# Altium PCB STAND_SSD_2246(CPU).PcbDoc (part 3 of 7)
Units mm, origin at the board's own origin, x right, y up, seen from the top; angles counter-clockwise.
Board outline 70 x 170 mm, 8 copper layers (L1:Top, L2:GND, L3:Sig, L4:VCC, L5:Sig, L6:Sig, L7:GND, L8:Bot), stack 1.112 mm thick; 174 components, 271 nets, 1671 pads, 771 vias.
Unrouted connection lines stored in the file: 138.
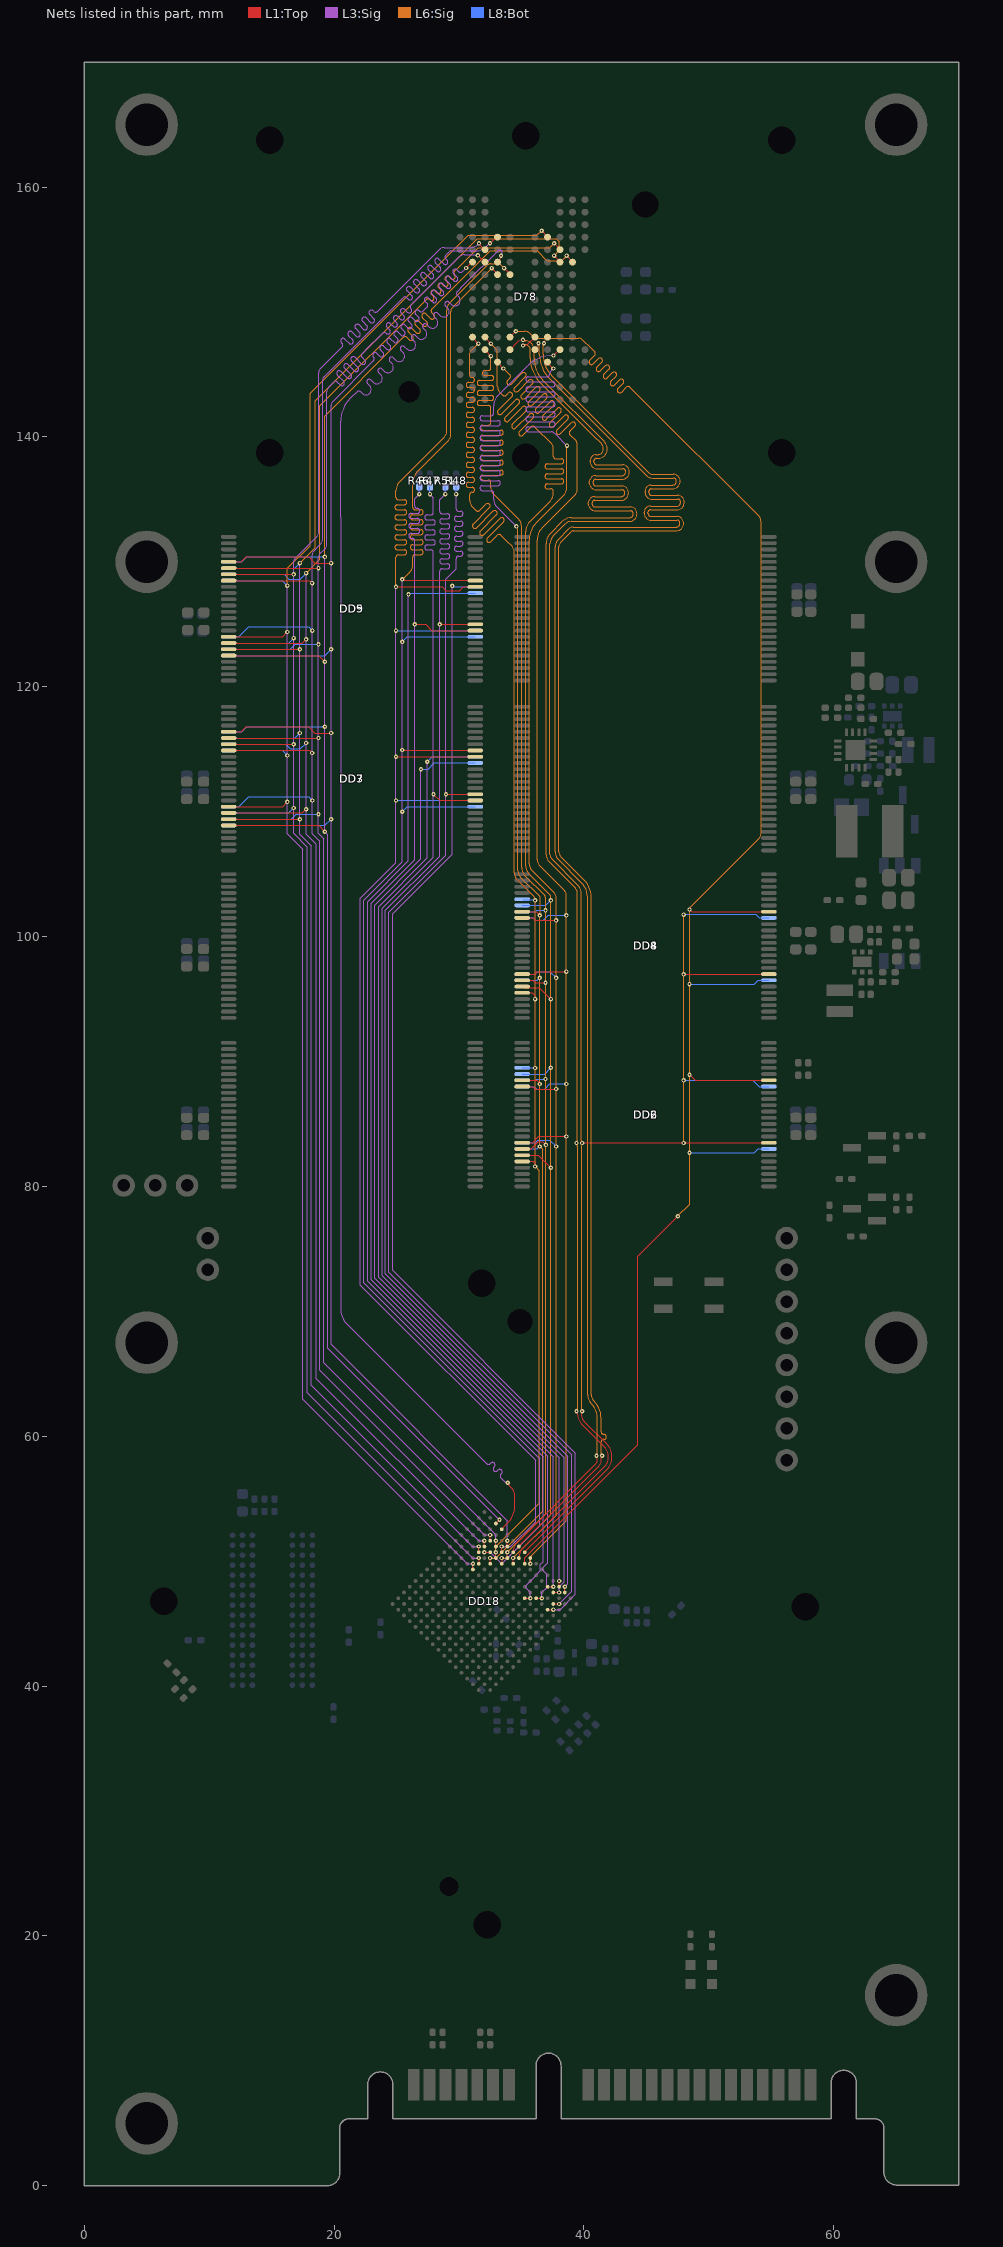
[diagram p9: the nets of this part, all layers, seen from the top]

## Via types
v1: diameter 0.35, hole 0.15, L1:Top to L8:Bot, tented both sides, 722 vias
v2: diameter 0.6, hole 0.3, L1:Top to L8:Bot, tented both sides, 45 vias
v3: diameter 0.6, hole 0.3, L1:Top to L8:Bot, tented bottom, 4 vias

## Nets (pads, with @x,y where several pads share a name; then routed paths per layer and width w, separated by ;. In a path a pad name is that pad's centre, name@x,y a point inside that pad or via, vN(x,y) a via of type N, cw(c..) or ccw(c..) an arc to the next point about the centre after c; other vN are vias at no path point) (continued)
F0D2: D78.N9 DD2.31 DD4.31 DD6.31 DD8.31 DD18.N12 | length 132
  L1:Top w0.1: DD18.N12@32.499,49.797 v1(32.499,50.256) ; DD2.31@35.059,88.5 36.212,88.5 v1@36.506,88.207 ; DD4.31@35.059,102 36.169,102 v1(36.469,101.7) ; v1(37.57,146.526) D78.N9@38.037,146.993
  L3:Sig w0.1: v1@34.616,132.867 v1(34.592,132.843) 33.024,134.412 cw(c33.622,135.009) 32.777,135.009 32.777,135.455 32.777,135.505 ccw(c32.577,135.505) 32.577,135.705 31.881,135.705 cw(c31.881,135.905) 31.881,136.105 33.119,136.105 ccw(c33.119,136.305) 33.119,136.505 31.881,136.505 cw(c31.881,136.705) 31.881,136.905 33.119,136.905 ccw(c33.119,137.105) 33.119,137.305 31.881,137.305 cw(c31.881,137.505) 31.881,137.705 33.119,137.705 ccw(c33.119,137.905) 33.119,138.105 31.881,138.105 cw(c31.881,138.305) 31.881,138.505 33.119,138.505 ccw(c33.119,138.705) 33.119,138.905 31.881,138.905 cw(c31.881,139.105) 31.881,139.305 33.119,139.305 ccw(c33.119,139.505) 33.119,139.705 31.881,139.705 cw(c31.881,139.905) 31.881,140.105 33.119,140.105 ccw(c33.119,140.305) 33.119,140.505 31.881,140.505 cw(c31.881,140.705) 31.881,140.905 33.119,140.905 ccw(c33.119,141.105) 33.119,141.305 31.881,141.305 cw(c31.881,141.505) 31.881,141.705 32.577,141.705 ccw(c32.577,141.905) 32.777,141.905 32.777,142.306 32.777,142.496 cw(c33.907,142.496) 33.107,143.294 35.518,145.705 cw(c37.499,143.724) 37.499,146.526 v1(37.57,146.526)
  L6:Sig w0.1: v1(32.499,50.256) 32.959,50.256 36.69,53.987 36.69,82.979 v1(36.469,83.2) v1(36.469,96.7) v1(36.469,101.7) ; v1(34.592,132.843) cw(c34.279,132.53) 34.722,132.53 34.722,105.291 ccw(c35.511,105.291) 34.953,104.733 36.427,103.259 cw(c36.242,103.073) 36.504,103.073 v1@36.504,101.746
  L8:Bot w0.1: DD6.31@35.064,83 36.281,83 v1@36.491,83.21 ; DD8.31@35.064,96.5 36.259,96.5 v1@36.485,96.726
  other v1: 36.469,88.2
F0D3: D78.P8 DD2.32 DD4.32 DD6.32 DD8.32 DD18.R10 | length 137.5
  L1:Top w0.1: DD18.R10@34.338,49.797 v1(34.338,50.256) ; DD2.32@35.059,88 35.907,88 36.107,87.8 v1(37.779,87.8) ; DD4.32@35.059,101.5 35.912,101.5 36.112,101.3 v1(37.779,101.3) ; D78.P8@37.088,145.942 v1(37.556,145.475)
  L3:Sig w0.1: v1(37.556,145.475) 37.556,145.466 37.43,145.34 37.289,145.2 37.25,145.104 37.25,145.013 cw(c37.05,145.013) 37.05,144.813 35.561,144.813 ccw(c35.561,144.613) 35.561,144.413 37.504,144.413 cw(c37.504,144.213) 37.504,144.013 35.561,144.013 ccw(c35.561,143.813) 35.561,143.613 37.504,143.613 cw(c37.504,143.413) 37.504,143.213 35.561,143.213 ccw(c35.561,143.013) 35.561,142.813 37.504,142.813 cw(c37.504,142.613) 37.504,142.413 35.561,142.413 ccw(c35.561,142.213) 35.561,142.013 37.504,142.013 cw(c37.504,141.813) 37.504,141.613 35.561,141.613 ccw(c35.561,141.413) 35.561,141.213 37.504,141.213 cw(c37.504,141.013) 37.504,140.813 35.561,140.813 ccw(c35.561,140.613) 35.561,140.413 37.404,140.413 cw(c37.404,140.071) 37.645,140.313 37.695,140.263 v1(38.648,139.31)
  L6:Sig w0.1: v1@34.395,50.199 34.395,50.314 37.779,53.698 37.779,54.878 v1(37.779,83.2) v1(37.779,96.7) v1(37.779,101.3) 37.779,103.134 ccw(c37.256,103.134) 37.626,103.504 35.862,105.268 cw(c36.439,105.845) 35.623,105.845 35.623,131.745 cw(c37.601,131.745) 36.202,133.144 38.381,135.323 ccw(c37.737,135.967) 38.648,135.967 v1(38.648,139.31)
  L8:Bot w0.1: DD6.32@35.064,83.5 36.092,83.5 36.292,83.7 37.279,83.7 v1(37.779,83.2) ; DD8.32@35.064,97 36.072,97 36.272,97.2 37.279,97.2 v1(37.779,96.7)
F0D4: D78.P4 DD2.41 DD4.41 DD6.41 DD8.41 DD18.U9 | length 140.7
  L1:Top w0.1: D78.P4@33.088,145.942 v1(33.556,145.475) ; DD2.41@35.059,83.5 35.074,83.514 35.907,83.514 36.394,84.001 v1(38.599,84) ; DD4.41@35.059,97 36.059,97 36.259,97.2 v1(38.599,97.2) ; v1(35.717,49.797) DD18.U9@35.717,50.256
  L6:Sig w0.1: v1(33.556,145.475) 33.585,145.475 33.756,145.303 34.075,144.985 cw(c33.933,144.844) 34.075,144.702 33.884,144.511 ccw(c34.025,144.37) 33.884,144.229 ccw(c34.025,144.37) 34.167,144.229 35.036,145.098 cw(c35.177,144.957) 35.319,145.098 cw(c35.177,144.957) 35.319,144.815 34.449,143.946 ccw(c34.591,143.804) 34.449,143.663 ccw(c34.591,143.804) 34.732,143.663 35.602,144.532 cw(c35.743,144.391) 35.885,144.532 cw(c35.743,144.391) 35.885,144.25 35.015,143.38 ccw(c35.157,143.239) 35.015,143.097 ccw(c35.157,143.239) 35.298,143.097 36.167,143.967 cw(c36.309,143.825) 36.45,143.967 cw(c36.309,143.825) 36.45,143.684 35.581,142.814 ccw(c35.722,142.673) 35.581,142.532 ccw(c35.722,142.673) 35.864,142.532 36.733,143.401 cw(c36.875,143.26) 37.016,143.401 cw(c36.875,143.26) 37.016,143.118 36.147,142.249 ccw(c36.288,142.107) 36.147,141.966 ccw(c36.288,142.107) 36.429,141.966 37.299,142.835 cw(c37.44,142.694) 37.582,142.835 cw(c37.44,142.694) 37.582,142.552 36.712,141.683 ccw(c36.854,141.542) 36.712,141.4 ccw(c36.854,141.542) 36.995,141.4 37.864,142.27 cw(c38.006,142.128) 38.147,142.27 cw(c38.006,142.128) 38.147,141.987 37.278,141.117 ccw(c37.419,140.976) 37.278,140.834 ccw(c37.419,140.976) 37.561,140.834 38.43,141.704 cw(c38.572,141.563) 38.713,141.704 cw(c38.572,141.563) 38.713,141.421 37.844,140.552 ccw(c37.985,140.41) 37.844,140.269 ccw(c37.985,140.41) 38.126,140.269 38.996,141.138 cw(c39.137,140.997) 39.279,141.138 cw(c39.137,140.997) 39.279,140.855 38.883,140.46 ccw(c39.024,140.318) 38.883,140.177 39.332,139.727 cw(c39.024,139.419) 39.46,139.419 39.46,135.824 cw(c38.71,135.824) 39.24,135.293 36.674,132.726 ccw(c37.68,131.72) 36.257,131.72 36.257,106.137 ccw(c36.925,106.137) 36.453,105.664 38.424,103.693 cw(c38.003,103.271) 38.599,103.271 v1(38.599,101.7) v1(38.599,97.2) v1(38.599,84) 38.599,54.582 38.599,53.222 35.717,50.339 v1(35.717,49.797)
  L8:Bot w0.1: DD6.41@35.064,88 36.032,88 36.232,87.8 36.865,87.8 37.272,88.208 38.592,88.208 v1(38.599,88.2) ; DD8.41@35.064,101.5 35.964,101.5 36.164,101.3 36.762,101.3 37.167,101.705 38.594,101.705 v1(38.599,101.7)
F0D5: D78.N3 DD2.42 DD4.42 DD6.42 DD8.42 DD18.R11 | length 133.9
  L1:Top w0.1: D78.N3@32.088,146.942 v1(32.556,146.475) ; DD18.R11@33.878,50.256 v1(33.878,50.716) ; DD2.42@35.059,83 35.776,83 36.347,83.571 36.718,83.571 v1(36.959,83.33) ; DD4.42@35.059,96.5 35.913,96.5 36.113,96.3 36.925,96.3 v1(36.929,96.304)
  L6:Sig w0.1: v1(32.556,146.475) 32.556,145.841 32.556,145.52 cw(c32.356,145.52) 32.356,145.32 32.076,145.32 ccw(c32.076,145.12) 32.076,144.92 32.597,144.92 cw(c32.597,144.72) 32.597,144.52 31.65,144.52 ccw(c31.65,144.32) 31.65,144.12 32.597,144.12 cw(c32.597,143.92) 32.597,143.72 31.65,143.72 ccw(c31.65,143.52) 31.65,143.32 32.597,143.32 cw(c32.597,143.12) 32.597,142.92 31.65,142.92 ccw(c31.65,142.72) 31.65,142.52 32.356,142.52 cw(c32.356,142.32) 32.556,142.32 32.556,142.27 32.556,141.746 32.556,141.152 cw(c32.356,141.152) 32.356,140.952 31.924,140.952 ccw(c31.924,140.752) 31.924,140.552 33.356,140.552 cw(c33.356,140.352) 33.356,140.152 31.924,140.152 ccw(c31.924,139.952) 31.924,139.752 33.356,139.752 cw(c33.356,139.552) 33.356,139.352 31.924,139.352 ccw(c31.924,139.152) 31.924,138.952 33.356,138.952 cw(c33.356,138.752) 33.356,138.552 31.924,138.552 ccw(c31.924,138.352) 31.924,138.152 33.356,138.152 cw(c33.356,137.952) 33.356,137.752 31.924,137.752 ccw(c31.924,137.552) 31.924,137.352 33.356,137.352 cw(c33.356,137.152) 33.356,136.952 31.924,136.952 ccw(c31.924,136.752) 31.924,136.552 32.356,136.552 cw(c32.356,136.352) 32.556,136.352 32.556,136.302 32.556,135.951 ccw(c33.325,135.951) 32.781,135.407 34.795,133.393 cw(c34.274,132.871) 35.011,132.871 35.011,105.536 ccw(c35.938,105.536) 35.283,104.88 36.857,103.306 cw(c36.682,103.132) 36.929,103.132 v1(36.929,102.1) v1(36.929,96.304) 36.929,83.33 36.967,83.292 36.967,53.805 v1(33.878,50.716)
  L8:Bot w0.1: DD6.42@35.064,88.5 36.094,88.5 36.194,88.6 v1(36.929,88.6) ; DD8.42@35.064,102 36.126,102 36.226,102.1 v1(36.929,102.1)
F0D6: D78.M3 DD2.43 DD4.43 DD6.43 DD8.43 DD18.P11 | length 136
  L1:Top w0.1: D78.M3@32.088,147.942 v1(32.556,147.475) ; DD18.P11@33.419,49.797 v1(33.419,50.256) ; DD2.43@35.059,82.5 36.359,82.5 v1(37.359,81.5) ; DD4.43@35.059,96 DD4.43@35.08,95.979 ; DD4.43@35.237,95.919 36.44,95.919 v1(37.359,95)
  L6:Sig w0.1: v1(32.556,147.475) 32.874,147.156 cw(c32.367,146.65) 33.084,146.65 33.084,144.07 ccw(c33.809,144.07) 33.245,143.615 ccw(c33.809,144.07) 33.277,143.577 33.296,143.558 33.505,143.349 ccw(c33.646,143.49) 33.788,143.349 33.955,143.516 cw(c34.097,143.375) 34.238,143.516 cw(c34.097,143.375) 34.238,143.234 33.136,142.131 ccw(c33.277,141.99) 33.136,141.848 ccw(c33.277,141.99) 33.419,141.848 34.521,142.951 cw(c34.663,142.809) 34.804,142.951 cw(c34.663,142.809) 34.804,142.668 33.702,141.565 ccw(c33.843,141.424) 33.702,141.283 ccw(c33.843,141.424) 33.984,141.283 35.087,142.385 cw(c35.228,142.244) 35.37,142.385 cw(c35.228,142.244) 35.37,142.102 34.267,141 ccw(c34.409,140.858) 34.267,140.717 ccw(c34.409,140.858) 34.55,140.717 35.652,141.819 cw(c35.794,141.678) 35.935,141.819 cw(c35.794,141.678) 35.935,141.536 34.833,140.434 ccw(c34.974,140.293) 34.833,140.151 ccw(c34.974,140.293) 35.116,140.151 35.768,140.803 cw(c35.909,140.662) 36.051,140.803 36.086,140.768 37.41,139.444 ; v1(33.419,50.256) 33.878,50.256 37.359,53.737 v1(37.359,89.5) v1(37.359,95) v1(37.359,102.9) 37.359,103.155 ccw(c37.085,103.155) 37.279,103.348 35.583,105.044 cw(c36.195,105.657) 35.329,105.657 35.329,132.413 cw(c36.459,132.413) 35.66,133.211 37.24,134.792 ccw(c36.468,135.564) 37.558,135.499 ccw(c36.468,135.564) 37.56,135.549 37.56,135.564 37.56,135.649 ccw(c37.36,135.649) 37.36,135.849 37.083,135.849 cw(c37.083,136.049) 37.083,136.249 38.191,136.249 ccw(c38.191,136.449) 38.191,136.649 37.083,136.649 cw(c37.083,136.849) 37.083,137.049 38.191,137.049 ccw(c38.191,137.249) 38.191,137.449 37.083,137.449 cw(c37.083,137.649) 37.083,137.849 38.191,137.849 ccw(c38.191,138.049) 38.191,138.249 37.76,138.249 cw(c37.76,138.449) 37.56,138.449 37.56,139.082 ccw(c37.048,139.082) 37.41,139.443
  L8:Bot w0.1: DD6.43@35.064,89 36.859,89 v1(37.359,89.5) ; DD8.43@35.064,102.5 36.959,102.5 v1(37.359,102.9)
F0D7: D78.M2 DD2.44 DD4.44 DD6.44 DD8.44 DD18.P12 | length 130.5
  L1:Top w0.1: D78.M2@31.088,147.942 v1(31.556,147.475) ; DD18.P12@32.959,50.256 v1(32.959,50.716) ; DD2.44@35.059,82 35.957,82 36.098,81.859 v1(36.099,81.6) ; DD4.44@35.059,95.5 35.88,95.5 36.099,95.281 v1(36.099,95)
  L6:Sig w0.1: v1(31.556,147.475) 30.984,146.903 ccw(c31.32,146.568) 30.881,146.748 ccw(c31.32,146.568) 30.863,146.698 30.845,146.568 30.845,144.969 ccw(c31.045,144.969) 31.045,144.769 31.05,144.769 cw(c31.05,144.569) 31.05,144.369 30.769,144.369 ccw(c30.769,144.169) 30.769,143.969 31.05,143.969 cw(c31.05,143.769) 31.05,143.569 30.769,143.569 ccw(c30.769,143.369) 30.769,143.169 31.05,143.169 cw(c31.05,142.969) 31.05,142.769 30.769,142.769 ccw(c30.769,142.569) 30.769,142.369 31.056,142.369 cw(c31.056,142.169) 31.056,141.969 30.769,141.969 ccw(c30.769,141.769) 30.769,141.569 31.056,141.569 cw(c31.056,141.369) 31.056,141.169 30.769,141.169 ccw(c30.769,140.969) 30.769,140.769 31.056,140.769 cw(c31.056,140.569) 31.056,140.369 30.769,140.369 ccw(c30.769,140.169) 30.769,139.969 31.056,139.969 cw(c31.056,139.769) 31.056,139.569 30.769,139.569 ccw(c30.769,139.369) 30.769,139.169 31.056,139.169 cw(c31.056,138.969) 31.056,138.769 30.769,138.769 ccw(c30.769,138.569) 30.769,138.369 31.056,138.369 cw(c31.056,138.169) 31.056,137.969 30.769,137.969 ccw(c30.769,137.769) 30.769,137.569 31.056,137.569 cw(c31.056,137.369) 31.056,137.169 30.769,137.169 ccw(c30.769,136.969) 30.769,136.769 31.056,136.769 cw(c31.056,136.569) 31.056,136.369 30.769,136.369 ccw(c30.769,136.169) 30.769,135.969 31.056,135.969 cw(c31.056,135.769) 31.056,135.569 31.045,135.569 ccw(c31.045,135.369) 30.845,135.369 30.845,134.943 ccw(c31.578,134.943) 30.845,134.919 ccw(c31.578,134.943) 31.06,134.425 31.336,134.148 31.372,134.113 ccw(c31.513,134.254) 31.655,134.113 32.155,134.613 cw(c32.296,134.472) 32.438,134.613 cw(c32.296,134.472) 32.438,134.33 31.138,133.031 ccw(c31.279,132.889) 31.138,132.748 ccw(c31.279,132.889) 31.421,132.748 32.721,134.047 cw(c32.862,133.906) 33.003,134.047 cw(c32.862,133.906) 33.003,133.765 31.704,132.465 ccw(c31.845,132.324) 31.704,132.182 ccw(c31.845,132.324) 31.987,132.182 33.286,133.482 cw(c33.428,133.34) 33.569,133.482 cw(c33.428,133.34) 33.569,133.199 32.269,131.899 ccw(c32.411,131.758) 32.269,131.616 ccw(c32.411,131.758) 32.552,131.616 33.069,132.133 cw(c33.21,131.992) 33.352,132.133 33.793,131.692 34.252,131.233 cw(c33.848,130.829) 34.419,130.829 34.419,105.133 ccw(c35.258,105.133) 34.665,104.54 35.992,103.213 cw(c35.733,102.954) 36.099,102.954 v1(36.099,102.9) v1(36.099,95) v1(36.099,81.6) 36.43,81.269 36.43,54.647 36.099,54.316 34.507,52.724 32.959,51.176 v1(32.959,50.716)
  L8:Bot w0.1: DD6.44@35.064,89.5 v1@36.099,89.5 ; DD8.44@35.144,102.95 v1@36.079,102.95
  other v1: 36.099,89.48
F0DQS_N: D78.M8 DD18.U11 | length 125.7
  L1:Top w0.1: DD18.U11@34.797,51.176 cw(c34.89,51.176) 34.825,51.241 41.222,57.638 ccw(c40.833,58.027) 41.383,58.027 41.383,58.236 cw(c41.429,58.236) 41.396,58.268 ; v1(36.813,147.502) cw(c37.335,147.502) 36.966,147.871 D78.M8@37.088,147.993
  L6:Sig w0.1: v1(36.813,147.502) 36.804,147.492 ccw(c36.896,147.4) 36.765,147.4 36.765,147.365 cw(c36.719,147.365) 36.752,147.332 ccw(c36.785,147.299) 36.738,147.299 36.738,146.627 ccw(c39.215,146.627) 37.464,144.876 45.21,137.129 ccw(c45.505,137.424) 45.505,137.007 47.172,137.007 cw(c47.172,136.471) 47.708,136.471 47.708,136.454 cw(c47.107,136.454) 47.107,135.852 45.408,135.852 ccw(c45.408,135.648) 45.204,135.648 45.204,135.558 ccw(c45.439,135.558) 45.439,135.323 47.508,135.323 cw(c47.508,134.787) 48.045,134.787 48.045,134.769 cw(c47.443,134.769) 47.443,134.168 ; v1(41.458,58.438) 41.448,58.448 cw(c41.541,58.541) 41.41,58.541 41.41,58.576 ccw(c41.363,58.576) 41.396,58.608 cw(c41.429,58.641) 41.383,58.641 41.383,59.103 41.383,59.553 cw(c41.583,59.553) 41.583,59.753 41.61,59.753 ccw(c41.61,59.953) 41.61,60.153 41.583,60.153 cw(c41.583,60.353) 41.383,60.353 41.383,61.063 41.383,61.446 ccw(c39.455,61.446) 40.818,62.809 40.817,62.811 cw(c41.34,63.334) 40.6,63.334 40.6,103.137 ccw(c38.635,103.137) 40.024,104.526 38.164,106.387 cw(c38.574,106.797) 37.994,106.797 37.994,131.205 cw(c38.522,131.205) 38.148,131.578 38.99,132.42 cw(c39.143,132.268) 39.143,132.484 43.448,132.484 ; 43.449,132.484 47.391,132.484 ; 47.442,134.168 45.336,134.168 ccw(c45.336,133.964) 45.132,133.964 45.132,133.874 ccw(c45.367,133.874) 45.367,133.639 47.456,133.639 cw(c47.456,133.102) 47.992,133.102 47.992,133.085 cw(c47.391,133.085) 47.391,132.484 ; 47.451,132.484 47.391,132.484
F0DQS_P: D78.N7 DD18.T11 | length 125.7
  L1:Top w0.1: DD18.T11@34.338,50.716 ccw(c34.31,50.744) 34.349,50.744 34.349,50.82 cw(c35.243,50.82) 34.611,51.452 40.966,57.807 ccw(c40.683,58.089) 41.083,58.089 41.083,58.236 ccw(c41.036,58.236) 41.069,58.268 ; D78.N7@36.088,146.993 36.198,147.103 ccw(c35.799,147.502) v1(36.363,147.502)
  L6:Sig w0.1: v1(36.363,147.502) 36.373,147.492 cw(c36.28,147.4) 36.411,147.4 36.411,147.365 ccw(c36.457,147.365) 36.425,147.332 cw(c36.392,147.299) 36.438,147.299 36.438,146.624 ccw(c39.208,146.624) 37.249,144.666 45,136.915 ccw(c45.502,137.418) 45.502,136.707 47.172,136.707 cw(c47.172,136.471) 47.408,136.471 47.408,136.454 cw(c47.107,136.454) 47.108,136.152 ; v1(41.008,58.438) 41.017,58.448 ccw(c40.924,58.541) 41.055,58.541 41.055,58.576 cw(c41.102,58.576) 41.069,58.608 ccw(c41.036,58.641) 41.083,58.641 41.083,61.444 ccw(c39.45,61.444) 40.604,62.598 40.603,62.6 cw(c41.335,63.332) 40.3,63.332 40.3,103.132 ccw(c38.624,103.132) 39.809,104.317 37.951,106.176 cw(c38.57,106.795) 37.694,106.795 37.694,131.207 cw(c38.518,131.207) 37.935,131.79 38.779,132.634 cw(c39.141,132.272) 39.141,132.784 47.391,132.784 ; 47.107,136.152 45.408,136.152 ccw(c45.408,135.648) 44.904,135.648 44.904,135.558 ccw(c45.439,135.558) 45.439,135.023 47.508,135.023 cw(c47.508,134.787) 47.745,134.787 47.745,134.769 cw(c47.443,134.769) 47.443,134.468 45.336,134.468 ccw(c45.336,133.964) 44.832,133.964 44.832,133.874 ccw(c45.367,133.874) 45.367,133.339 47.454,133.339 ; 47.451,132.784 47.391,132.784 ; 47.456,133.339 cw(c47.456,133.102) 47.692,133.102 47.692,133.085 cw(c47.391,133.085) 47.391,132.784
F0REN_N: D78.M7 DD18.T10 | length 125.6
  L1:Top w0.1: DD18.T10@34.797,50.256 ccw(c34.769,50.284) 34.809,50.284 34.809,50.36 cw(c35.726,50.36) 35.077,51.008 41.684,57.614 ccw(c41.042,58.257) 41.95,58.257 41.95,58.385 ccw(c40.825,58.385) 41.621,59.181 39.832,60.97 cw(c40.665,61.802) 39.487,61.802 39.487,61.804 ccw(c39.441,61.804) 39.474,61.837 ; v1(35.126,147.318) ccw(c35.126,148.013) 35.617,147.522 D78.M7@36.088,147.993
  L6:Sig w0.1: v1(35.126,147.318) 35.135,147.328 cw(c35.228,147.235) 35.228,147.366 35.263,147.366 ccw(c35.263,147.413) 35.296,147.38 cw(c35.329,147.347) 35.329,147.393 cw(c35.329,147.105) 35.532,147.309 35.649,147.193 cw(c35.495,147.039) 35.713,147.039 35.713,146.313 ccw(c38.55,146.313) 36.544,144.306 40.734,140.116 41.371,139.478 cw(c40.907,139.013) 41.564,139.013 cw(c41.143,139.013) 41.143,138.592 41.011,138.592 ccw(c41.011,138.088) 40.507,138.088 40.507,137.998 ccw(c41.042,137.998) 41.042,137.463 43.112,137.463 cw(c43.112,137.226) 43.348,137.226 43.348,137.209 cw(c43.046,137.209) 43.048,136.908 ; v1(39.412,62.007) 39.422,62.016 ccw(c39.329,62.109) 39.46,62.109 39.46,62.144 cw(c39.506,62.144) 39.474,62.177 ccw(c39.441,62.21) 39.487,62.21 39.487,83.217 39.488,83.218 39.488,83.281 ccw(c39.442,83.281) 39.475,83.314 cw(c39.507,83.347) 39.461,83.347 39.461,83.369 ccw(c39.298,83.369) v1(39.413,83.484) 39.423,83.493 ccw(c39.33,83.586) 39.461,83.586 39.461,83.621 cw(c39.507,83.621) 39.475,83.654 ccw(c39.442,83.687) 39.488,83.687 39.488,103.429 ccw(c38.745,103.429) 39.271,103.954 37.204,106.021 cw(c37.731,106.549) 36.985,106.549 36.985,131.459 cw(c38.172,131.459) 37.333,132.299 38.285,133.251 cw(c38.98,132.556) 38.98,133.539 43.654,133.539 ccw(c43.654,133.84) 43.955,133.84 43.955,133.858 ccw(c43.719,133.858) 43.719,134.094 ; 43.046,136.908 40.94,136.908 ccw(c40.94,136.404) 40.436,136.404 40.436,136.314 ccw(c40.971,136.314) 40.971,135.778 43.041,135.778 cw(c43.041,135.542) 43.277,135.542 43.277,135.525 cw(c42.975,135.525) 42.975,135.223 40.868,135.223 ccw(c40.868,134.719) 40.364,134.719 40.364,134.629 ccw(c40.899,134.629) 40.899,134.094 43.714,134.094
F0REN_P: D78.N5 DD2.8 DD4.8 DD6.8 DD8.8 DD18.U10 | length 179.5
  L1:Top w0.1: D78.N5@34.088,146.993 34.678,147.583 cw(c35.126,147.135) v1(35.126,147.768) ; DD18.U10@35.257,50.716 cw(c35.37,50.716) 35.29,50.796 41.898,57.404 ccw(c41.048,58.255) 42.25,58.255 42.25,58.387 ccw(c40.828,58.387) 41.834,59.392 40.045,61.181 cw(c40.668,61.804) 39.787,61.804 cw(c39.834,61.804) 39.801,61.837 ; v1(39.863,83.484) 47.984,83.484 v1(47.987,83.481) ; v1@48.055,83.5 DD2.8@54.809,83.5 ; v1@48.055,97 DD4.8@54.809,97
  L6:Sig w0.1: v1(35.126,147.768) 35.135,147.759 ccw(c35.228,147.852) 35.228,147.721 35.263,147.721 cw(c35.263,147.674) 35.296,147.707 ccw(c35.329,147.74) 35.329,147.693 35.33,147.693 cw(c35.33,147.109) 35.744,147.522 35.863,147.403 cw(c35.501,147.041) 36.013,147.041 36.013,146.313 ccw(c38.553,146.313) 36.757,144.517 41.586,139.688 cw(c40.914,139.016) 41.864,139.016 41.864,139.013 cw(c41.143,139.013) 41.143,138.292 41.011,138.292 ccw(c41.011,138.088) 40.807,138.088 40.807,137.998 ccw(c41.042,137.998) 41.042,137.763 43.112,137.763 cw(c43.112,137.226) 43.648,137.226 43.648,137.209 cw(c43.046,137.209) 43.046,136.608 40.94,136.608 ccw(c40.94,136.404) 40.736,136.404 40.736,136.314 ccw(c40.971,136.314) 40.971,136.078 43.041,136.078 cw(c43.041,135.542) 43.577,135.542 43.577,135.525 cw(c42.975,135.525) 42.975,134.923 ; 39.787,83.272 39.787,62.21 ccw(c39.834,62.21) 39.801,62.177 cw(c39.768,62.144) 39.814,62.144 39.814,62.109 ccw(c39.945,62.109) 39.853,62.016 v1(39.862,62.007) ; 39.788,83.281 cw(c39.835,83.281) 39.802,83.314 ; v1(39.863,83.484) 39.854,83.493 cw(c39.946,83.586) 39.815,83.586 39.815,83.621 ccw(c39.769,83.621) 39.802,83.654 cw(c39.835,83.687) 39.788,83.687 39.788,103.432 ccw(c38.753,103.432) 39.485,104.164 37.417,106.232 cw(c37.735,106.551) 37.285,106.551 37.285,131.457 cw(c38.178,131.457) 37.546,132.088 38.496,133.038 cw(c38.982,132.552) 38.982,133.239 43.654,133.239 ccw(c43.654,133.84) 44.255,133.84 44.255,133.858 ccw(c43.719,133.858) 43.719,134.394 40.899,134.394 cw(c40.899,134.629) 40.664,134.629 40.664,134.719 cw(c40.868,134.719) 40.868,134.923 42.974,134.923 ; v1@47.987,83.402 v1(47.987,83.481) v1(47.987,88.491) v1(47.987,96.981) v1(47.987,101.761)
  L8:Bot w0.1: v1@47.972,101.773 53.763,101.773 54.035,101.5 DD8.8@54.814,101.5 ; v1@47.987,88.503 53.533,88.503 54.035,88 DD6.8@54.814,88
F0WEN: D78.M5 DD2.18 DD4.18 DD6.18 DD8.18 DD18.T9 | length 151.7
  L1:Top w0.1: D78.M5@34.088,147.993 v1(34.556,148.46) ; DD18.T9@35.257,49.797 35.257,50.259 44.33,59.332 44.33,74.43 v1@47.435,77.535 ; v1(48.459,88.94) 48.899,88.5 DD2.18@54.809,88.5 ; v1(48.459,102.17) 48.629,102 DD4.18@54.809,102
  L6:Sig w0.1: v1(34.556,148.46) 34.563,148.468 35.262,148.468 cw(c35.262,147.905) 35.66,148.303 35.948,148.015 ccw(c36.191,148.258) 36.191,147.915 39.57,147.915 cw(c39.57,147.472) 39.883,147.785 40.54,147.128 40.859,146.81 cw(c40.717,146.668) 40.859,146.527 40.469,146.138 ccw(c40.61,145.996) 40.469,145.855 ccw(c40.61,145.996) 40.752,145.855 41.158,146.261 cw(c41.299,146.119) 41.441,146.261 cw(c41.299,146.119) 41.441,145.978 41.035,145.572 ccw(c41.176,145.43) 41.035,145.289 ccw(c41.176,145.43) 41.318,145.289 41.724,145.695 cw(c41.865,145.554) 42.007,145.695 cw(c41.865,145.554) 42.007,145.412 41.6,145.006 ccw(c41.742,144.865) 41.6,144.723 ccw(c41.742,144.865) 41.883,144.723 42.289,145.129 cw(c42.431,144.988) 42.572,145.129 cw(c42.431,144.988) 42.572,144.847 42.166,144.44 ccw(c42.308,144.299) 42.166,144.158 ccw(c42.308,144.299) 42.449,144.158 42.855,144.564 cw(c42.997,144.422) 43.138,144.564 cw(c42.997,144.422) 43.138,144.281 42.732,143.875 ccw(c42.873,143.733) 42.732,143.592 ccw(c42.873,143.733) 43.015,143.592 43.404,143.981 cw(c43.546,143.84) 43.687,143.981 44.209,143.46 53.99,133.678 cw(c53.527,133.215) 54.182,133.215 54.182,108.235 cw(c53.697,108.235) 54.04,107.892 ; v1(47.521,77.62) 47.521,77.637 48.459,78.575 v1(48.459,82.7) v1(48.459,88.94) v1(48.459,96.2) v1(48.459,102.17) 48.459,102.175 cw(c48.788,102.175) 48.555,102.408 54.04,107.892
  L8:Bot w0.1: v1(48.459,82.7) 53.659,82.7 53.959,83 DD6.18@54.814,83 ; v1(48.459,96.2) 53.659,96.2 53.959,96.5 DD8.18@54.814,96.5
F1ALE: D78.G4 DD3.17 DD5.17 DD7.17 DD9.17 DD18.P13 | length 149.6
  L1:Top w0.1: v1@25.459,115 25.559,114.9 DD3.17@31.309,114.9 ; v1(25.459,128.6) v1@25.519,128.54 ; v1@25.479,128.54 v1@25.519,128.54 ; DD5.17@31.229,128.54 v1@25.519,128.54 ; v1(32.04,50.716) DD18.P13@32.499,50.716 ; v1(32.621,153.511) D78.G4@33.088,153.044
  L3:Sig w0.1: v1(25.459,128.6) v1(25.459,123.6) 25.459,105.994 22.397,102.932 22.397,72.272 36.453,58.216 36.453,52.831 33.617,49.995 33.553,49.931 33.284,49.931 33.22,49.995 32.499,50.716 ; v1(32.04,50.716) 32.499,50.716
  L6:Sig w0.1: v1(25.459,128.6) 25.481,128.6 26.057,129.176 ccw(c25.476,129.757) 26.298,129.757 26.298,129.929 26.298,130.379 cw(c26.498,130.379) 26.498,130.579 26.935,130.579 ccw(c26.935,130.779) 26.935,130.979 26.305,130.979 cw(c26.305,131.179) 26.305,131.379 26.935,131.379 ccw(c26.935,131.579) 26.935,131.779 26.305,131.779 cw(c26.305,131.979) 26.305,132.179 26.935,132.179 ccw(c26.935,132.379) 26.935,132.579 26.305,132.579 cw(c26.305,132.779) 26.305,132.979 26.935,132.979 ccw(c26.935,133.179) 26.935,133.379 26.305,133.379 cw(c26.305,133.579) 26.305,133.779 26.935,133.779 ccw(c26.935,133.979) 26.935,134.179 26.498,134.179 cw(c26.498,134.379) 26.298,134.379 26.298,135.243 26.298,136.193 cw(c27.927,136.193) 26.775,137.345 29.184,139.755 ccw(c28.832,140.107) 29.33,140.107 29.33,150.028 cw(c29.778,150.028) 29.462,150.344 32.621,153.504 v1(32.621,153.511)
  L8:Bot w0.1: v1(25.459,110) 25.859,110.4 DD7.17@31.309,110.4 ; v1(25.459,123.6) 25.859,124 DD9.17@31.309,124
  other v1: 25.459,114.94
F1CE0: DD3.9 DD18.T4 R47.1 | length 105.8
  L1:Top w0.1: v1(27.959,111.4) 28.459,110.9 DD3.9@31.309,110.9 ; DD18.T4@37.555,47.499 v1(38.015,47.499)
  L3:Sig w0.1: v1(27.682,135.418) 27.959,135.141 27.959,134.408 27.959,133.958 cw(c27.759,133.958) 27.759,133.758 27.45,133.758 ccw(c27.45,133.558) 27.45,133.358 27.915,133.358 cw(c27.915,133.158) 27.915,132.958 27.45,132.958 ccw(c27.45,132.758) 27.45,132.558 27.915,132.558 cw(c27.915,132.358) 27.915,132.158 27.45,132.158 ccw(c27.45,131.958) 27.45,131.758 27.915,131.758 cw(c27.915,131.558) 27.915,131.358 27.45,131.358 ccw(c27.45,131.158) 27.45,130.958 27.759,130.958 cw(c27.759,130.758) 27.959,130.758 27.959,130.106 v1(27.959,111.4) 27.959,106.373 23.848,102.261 23.848,72.853 38.42,58.28 38.42,48.364 38.015,47.958 v1(38.015,47.499)
  L8:Bot w0.1: v1(27.682,135.418) R47.1@27.682,136.006
F1CE1: DD5.9 DD18.P5 R46.1 | length 106.5
  L1:Top w0.1: v1(26.459,125) 27.34,125 27.84,124.5 DD5.9@31.309,124.5 ; DD18.P5@36.176,47.039 v1(36.636,47.039)
  L3:Sig w0.1: v1(26.823,135.418) 26.459,135.055 26.459,134.882 26.459,134.479 ccw(c26.659,134.479) 26.659,134.279 26.674,134.279 cw(c26.674,134.079) 26.674,133.879 26.184,133.879 ccw(c26.184,133.679) 26.184,133.479 26.674,133.479 cw(c26.674,133.279) 26.674,133.079 26.184,133.079 ccw(c26.184,132.879) 26.184,132.679 26.674,132.679 cw(c26.674,132.479) 26.674,132.279 26.184,132.279 ccw(c26.184,132.079) 26.184,131.879 26.259,131.879 cw(c26.259,131.679) 26.459,131.679 26.459,131.629 v1(26.459,125) 26.459,106.146 22.973,102.66 22.973,72.546 37.097,58.422 37.097,49.881 36.75,49.535 36.75,49.223 37.02,48.953 37.02,47.883 36.636,47.499 v1(36.636,47.039)
  L8:Bot w0.1: v1@26.79,135.386 v1(26.823,135.418) R46.1@26.823,136.006
F1CE2: DD3.10 DD18.R3 R48.1 | length 105.9
  L1:Top w0.1: v1(28.959,111.4) DD3.10@31.309,111.4 ; DD18.R3@37.555,46.579 v1(38.015,46.579)
  L3:Sig w0.1: v1(29.774,135.418) 29.774,134.907 29.774,134.26 ccw(c29.974,134.26) 29.974,134.06 30.127,134.06 cw(c30.127,133.86) 30.127,133.66 29.829,133.66 ccw(c29.829,133.46) 29.829,133.26 30.127,133.26 cw(c30.127,133.06) 30.127,132.86 29.829,132.86 ccw(c29.829,132.66) 29.829,132.46 30.127,132.46 cw(c30.127,132.26) 30.127,132.06 29.829,132.06 ccw(c29.829,131.86) 29.829,131.66 30.127,131.66 cw(c30.127,131.46) 30.127,131.26 29.829,131.26 ccw(c29.829,131.06) 29.829,130.86 30.127,130.86 cw(c30.127,130.66) 30.127,130.46 29.974,130.46 ccw(c29.974,130.26) 29.774,130.26 29.774,129.81 29.774,129.434 28.959,128.619 v1(28.959,111.4) 28.959,106.524 24.396,101.961 24.396,73.133 39.02,58.508 39.02,47.585 v1(38.015,46.579)
  L8:Bot w0.1: v1(29.774,135.418) R48.1@29.774,136.006
F1CE3: DD5.10 DD18.U3 R51.1 | length 107.3
  L1:Top w0.1: v1(28.459,125) DD5.10@31.309,125 ; DD18.U3@38.474,47.499 v1(38.474,47.958)
  L3:Sig w0.1: v1(28.914,135.418) 28.459,134.963 28.459,134.544 28.459,134.054 ccw(c28.659,134.054) 28.659,133.854 29.076,133.854 cw(c29.076,133.654) 29.076,133.454 28.651,133.454 ccw(c28.651,133.254) 28.651,133.054 29.076,133.054 cw(c29.076,132.854) 29.076,132.654 28.651,132.654 ccw(c28.651,132.454) 28.651,132.254 29.076,132.254 cw(c29.076,132.054) 29.076,131.854 28.651,131.854 ccw(c28.651,131.654) 28.651,131.454 29.076,131.454 cw(c29.076,131.254) 29.076,131.054 28.651,131.054 ccw(c28.651,130.854) 28.651,130.654 29.076,130.654 cw(c29.076,130.454) 29.076,130.254 28.651,130.254 ccw(c28.651,130.054) 28.651,129.854 29.076,129.854 cw(c29.076,129.654) 29.076,129.454 28.659,129.454 ccw(c28.659,129.254) 28.459,129.254 28.459,128.804 v1(28.459,125) 28.459,106.449 24.119,102.109 24.119,73.012 38.72,58.411 38.72,48.204 v1(38.474,47.958)
  L8:Bot w0.1: v1(28.914,135.418) R51.1@28.914,136.006
F1CE4: DD7.9 DD18.U4 | length 77.7
  L1:Top w0.1: DD18.U4@38.015,47.958 v1(38.015,48.418)
  L3:Sig w0.1: v1(27.459,114) 27.459,106.297 23.561,102.399 23.561,72.751 38.015,58.297 v1(38.015,48.418)
  L8:Bot w0.1: v1(27.459,114) 27.859,114.4 DD7.9@31.309,114.4
F1CE5: DD9.9 DD18.P3 | length 93.4
  L1:Top w0.1: DD18.P3@37.096,46.12 v1(37.555,46.12)
  L3:Sig w0.1: v1@29.459,128.1 29.459,106.6 24.681,101.822 24.681,73.275 39.32,58.636 39.32,47.339 38.101,46.12 v1(37.555,46.12)
  L8:Bot w0.1: v1@29.459,128.1 29.559,128 DD9.9@31.309,128
  other v1: 29.459,128.08
F1CE6: DD7.10 DD18.T5 | length 77.9
  L1:Top w0.1: DD18.T5@37.096,47.958 v1(37.555,47.958)
  L3:Sig w0.1: v1(26.959,113.4) 26.959,106.221 23.263,102.525 23.263,72.661 37.555,58.368 v1(37.555,47.958)
  L8:Bot w0.1: v1(26.959,113.4) 27.522,113.4 28.022,113.9 DD7.10@31.309,113.9
F1CE7: DD9.10 DD18.N6 | length 94.1
  L1:Top w0.1: DD18.N6@35.257,47.039 v1(35.717,47.039)
  L3:Sig w0.1: v1@25.944,127.4 25.944,106.054 22.682,102.793 22.682,72.424 36.761,58.345 36.761,49.97 36.528,49.737 36.528,49.228 35.794,48.494 35.387,48.087 35.387,47.833 35.717,47.504 v1(35.717,47.039)
  L8:Bot w0.1: v1(25.959,127.4) 26.059,127.5 DD9.10@31.309,127.5
F1CLE: D78.G5 DD3.16 DD5.16 DD7.16 DD9.16 DD18.R12 | length 151.5
  L1:Top w0.1: v1(24.959,114.4) 28.659,114.4 DD3.16@31.309,114.4 ; v1(24.959,128) 28.659,128 28.959,127.7 30.059,127.7 30.359,128 DD5.16@31.309,128 ; DD18.R12@33.419,50.716 v1(33.419,51.176) ; v1(33.621,153.511) D78.G5@34.088,153.044
  L3:Sig w0.1: v1(24.959,128) 24.959,105.918 22.105,103.064 22.105,72.101 36.131,58.075 36.131,53.161 34.109,51.139 v1@33.455,51.139
  L6:Sig w0.1: v1(24.959,128) 24.959,129.921 24.959,130.371 cw(c25.159,130.371) 25.159,130.571 25.621,130.571 ccw(c25.621,130.771) 25.621,130.971 25.074,130.971 cw(c25.074,131.171) 25.074,131.371 25.621,131.371 ccw(c25.621,131.571) 25.621,131.771 25.074,131.771 cw(c25.074,131.971) 25.074,132.171 25.621,132.171 ccw(c25.621,132.371) 25.621,132.571 25.074,132.571 cw(c25.074,132.771) 25.074,132.971 25.621,132.971 ccw(c25.621,133.171) 25.621,133.371 25.074,133.371 cw(c25.074,133.571) 25.074,133.771 25.621,133.771 ccw(c25.621,133.971) 25.621,134.171 25.074,134.171 cw(c25.074,134.371) 25.074,134.571 25.621,134.571 ccw(c25.621,134.771) 25.621,134.971 25.159,134.971 cw(c25.159,135.171) 24.959,135.171 24.959,135.423 24.959,135.689 cw(c25.996,135.689) 25.263,136.422 28.864,140.024 ccw(c28.493,140.395) 29.018,140.395 29.018,150.14 cw(c29.87,150.14) 29.268,150.742 32.283,153.758 ; 32.283,153.758 cw(c32.535,153.505) 32.535,153.862 33.09,153.862 cw(c33.09,153.428) 33.397,153.735 v1(33.621,153.511) ; v1@33.589,153.589 cw(c33.511,153.511) v1(33.621,153.511) ; v1@33.641,153.491 v1(33.621,153.511)
  L8:Bot w0.1: v1(24.959,110.9) DD7.16@31.309,110.9 ; v1(24.959,124.5) DD9.16@31.309,124.5
F1D0: D78.F2 DD3.29 DD5.29 DD7.29 DD9.29 DD18.T12 | length 160.6
  L1:Top w0.1: DD3.29@11.559,116.4 12.559,116.4 12.959,116.8 17.965,116.8 18.465,116.3 v1(19.765,116.3) ; DD5.29@11.559,130 12.559,130 12.959,130.4 17.965,130.4 18.465,129.9 v1(19.765,129.9) ; v1(30.57,153.526) D78.F2@31.037,153.993 ; DD18.T12@33.878,51.176 v1(33.878,51.635)
  L3:Sig w0.1: v1@19.759,116.3 19.759,109.4 19.759,67.367 33.878,53.248 v1(33.878,51.635) ; v1(19.765,116.3) v1(19.765,123) v1(19.765,129.9) 19.765,142.553 cw(c20.167,142.553) 19.882,142.838 23.125,146.081 23.16,146.116 ccw(c23.019,146.257) 23.16,146.399 23.145,146.414 cw(c23.287,146.555) 23.145,146.697 cw(c23.287,146.555) 23.428,146.697 23.653,146.472 ccw(c23.794,146.613) 23.936,146.472 ccw(c23.794,146.613) 23.936,146.755 23.711,146.98 cw(c23.852,147.121) 23.711,147.262 cw(c23.852,147.121) 23.994,147.262 24.219,147.038 ccw(c24.36,147.179) 24.501,147.038 ccw(c24.36,147.179) 24.501,147.32 24.277,147.545 cw(c24.418,147.687) 24.277,147.828 cw(c24.418,147.687) 24.56,147.828 24.784,147.603 ccw(c24.926,147.745) 25.067,147.603 ccw(c24.926,147.745) 25.067,147.886 24.842,148.111 cw(c24.984,148.252) 24.842,148.394 cw(c24.984,148.252) 25.125,148.394 25.35,148.169 ccw(c25.491,148.31) 25.633,148.169 ccw(c25.491,148.31) 25.633,148.452 25.408,148.677 cw(c25.549,148.818) 25.408,148.96 cw(c25.549,148.818) 25.691,148.959 25.916,148.735 ccw(c26.057,148.876) 26.199,148.735 ccw(c26.057,148.876) 26.199,149.018 25.974,149.242 cw(c26.115,149.384) 25.974,149.525 cw(c26.115,149.384) 26.257,149.525 26.481,149.3 ccw(c26.623,149.442) 26.764,149.3 ccw(c26.623,149.442) 26.764,149.583 26.539,149.808 cw(c26.681,149.949) 26.539,150.091 cw(c26.681,149.949) 26.822,150.091 26.837,150.076 ccw(c26.979,150.217) 27.12,150.076 27.41,150.366 27.445,150.401 ccw(c27.304,150.542) 27.445,150.684 27.291,150.838 cw(c27.432,150.98) 27.291,151.121 cw(c27.432,150.98) 27.573,151.121 27.883,150.812 ccw(c28.024,150.953) 28.166,150.812 ccw(c28.024,150.953) 28.166,151.095 27.856,151.404 cw(c27.998,151.546) 27.856,151.687 cw(c27.998,151.546) 28.139,151.687 28.448,151.378 ccw(c28.59,151.519) 28.731,151.378 ccw(c28.59,151.519) 28.731,151.661 28.422,151.97 cw(c28.563,152.111) 28.422,152.253 cw(c28.563,152.111) 28.705,152.253 29.014,151.943 ccw(c29.155,152.085) 29.297,151.943 ccw(c29.155,152.085) 29.297,152.226 28.988,152.536 cw(c29.129,152.677) 28.988,152.818 cw(c29.129,152.677) 29.27,152.818 29.58,152.509 ccw(c29.721,152.651) 29.863,152.509 ccw(c29.721,152.651) 29.863,152.792 29.553,153.101 cw(c29.695,153.243) 29.553,153.384 cw(c29.695,153.243) 29.836,153.384 29.991,153.229 ccw(c30.132,153.371) 30.274,153.229 30.524,153.48 v1(30.57,153.526)
  L8:Bot w0.1: DD7.29@11.559,108.9 19.265,108.9 v1(19.765,109.4) ; DD9.29@11.559,122.5 19.265,122.5 v1(19.765,123)
F1D1: D78.F3 DD3.30 DD5.30 DD7.30 DD9.30 DD18.R13 | length 155.6
  L1:Top w0.1: DD3.30@11.559,115.9 v1(18.751,115.9) ; DD5.30@11.559,129.5 v1(18.751,129.5) ; v1@31.543,154.503 D78.F3@32.003,154.044 ; D78.F3@32.063,154.044 D78.F3@32.088,154.044 ; DD18.R13@32.959,51.176 v1(32.959,51.635)
  L3:Sig w0.1: v1@18.744,129.5 18.744,108.26 19.159,107.845 19.159,65.895 32.634,52.42 32.824,52.229 32.959,52.095 v1(32.959,51.635) ; v1(18.751,129.5) 18.751,130.343 cw(c19.165,130.343) 18.872,130.636 19.278,131.041 ccw(c18.919,131.4) 19.427,131.4 19.427,143.615 cw(c19.968,143.615) 19.585,143.998 19.663,144.076 19.981,144.394 cw(c20.123,144.253) 20.264,144.394 20.496,144.163 ccw(c20.637,144.304) 20.779,144.163 ccw(c20.637,144.304) 20.779,144.445 20.265,144.959 cw(c20.406,145.101) 20.265,145.242 cw(c20.406,145.101) 20.548,145.242 21.061,144.728 ccw(c21.203,144.87) 21.344,144.728 ccw(c21.203,144.87) 21.344,145.011 20.831,145.525 cw(c20.972,145.666) 20.831,145.808 cw(c20.972,145.666) 21.113,145.808 21.627,145.294 ccw(c21.769,145.435) 21.91,145.294 ccw(c21.769,145.435) 21.91,145.577 21.396,146.091 cw(c21.538,146.232) 21.396,146.373 cw(c21.538,146.232) 21.679,146.373 22.193,145.86 ccw(c22.334,146.001) 22.476,145.86 ccw(c22.334,146.001) 22.476,146.142 22.244,146.374 cw(c22.386,146.515) 22.244,146.657 22.835,147.248 23.567,147.98 23.886,148.298 cw(c24.027,148.157) 24.169,148.298 24.175,148.292 ccw(c24.316,148.433) 24.458,148.292 ccw(c24.316,148.433) 24.458,148.575 24.234,148.799 cw(c24.375,148.94) 24.234,149.082 cw(c24.375,148.94) 24.517,149.082 24.741,148.858 ccw(c24.882,148.999) 25.024,148.858 ccw(c24.882,148.999) 25.024,149.14 24.8,149.364 cw(c24.941,149.506) 24.8,149.647 cw(c24.941,149.506) 25.082,149.647 25.306,149.423 ccw(c25.448,149.565) 25.589,149.423 ccw(c25.448,149.565) 25.589,149.706 25.365,149.93 cw(c25.507,150.071) 25.365,150.213 cw(c25.507,150.071) 25.648,150.213 25.872,149.989 ccw(c26.013,150.13) 26.155,149.989 ccw(c26.013,150.13) 26.155,150.272 26.148,150.278 cw(c26.29,150.42) 26.148,150.561 26.825,151.237 29.951,154.363 cw(c30.472,153.842) 30.472,154.579 31.42,154.579 cw(c31.42,154.451) v1@31.51,154.542
  L8:Bot w0.1: DD7.30@11.559,109.4 16.581,109.4 16.981,109.8 v1(18.751,109.8) ; DD9.30@11.559,123 16.513,123 16.913,123.4 v1(18.751,123.4)
  other v1: 31.513,154.539
F1D2: D78.E3 DD3.31 DD5.31 DD7.31 DD9.31 DD18.M13 | length 147.8
  L1:Top w0.1: DD3.31@11.559,115.4 v1(16.765,115.4) ; DD5.31@11.559,129 v1(16.765,129) ; DD18.M13@31.58,49.797 v1(31.58,50.256) ; v1@31.597,155.484 D78.E3@32.088,154.993
  L3:Sig w0.1: v1(31.58,50.256) 31.12,50.256 17.834,63.543 17.834,107.193 16.765,108.262 v1(16.765,115.4) v1(16.765,123.9) v1(16.765,129) 16.765,129.997 cw(c17.138,129.997) 16.874,130.261 18.611,131.998 ccw(c18.244,132.366) 18.764,132.366 18.764,145.156 cw(c19.189,145.156) 18.888,145.456 20.61,147.178 20.645,147.213 ccw(c20.503,147.355) 20.645,147.496 20.59,147.551 cw(c20.732,147.692) 20.59,147.834 cw(c20.732,147.692) 20.873,147.834 21.208,147.498 ccw(c21.35,147.64) 21.491,147.498 ccw(c21.35,147.64) 21.491,147.781 21.156,148.116 cw(c21.297,148.258) 21.156,148.399 cw(c21.297,148.258) 21.439,148.399 21.774,148.064 ccw(c21.915,148.206) 22.057,148.064 ccw(c21.915,148.206) 22.057,148.347 21.722,148.682 cw(c21.863,148.824) 21.722,148.965 cw(c21.863,148.824) 22.004,148.965 22.34,148.63 ccw(c22.481,148.771) 22.622,148.63 ccw(c22.481,148.771) 22.622,148.913 22.287,149.248 cw(c22.429,149.389) 22.287,149.531 cw(c22.429,149.389) 22.57,149.531 22.905,149.196 ccw(c23.047,149.337) 23.188,149.196 ccw(c23.047,149.337) 23.188,149.478 22.853,149.813 cw(c22.994,149.955) 22.853,150.096 cw(c22.994,149.955) 23.136,150.096 23.19,150.042 ccw(c23.332,150.183) 23.473,150.042 23.896,150.464 28.43,154.999 cw(c28.818,154.611) 28.818,155.159 30.925,155.159 ccw(c30.925,155.982) 31.506,155.4 v1(31.6,155.494)
  L8:Bot w0.1: DD7.31@11.559,109.9 16.365,109.9 v1(16.765,110.3) ; DD9.31@11.559,123.5 16.365,123.5 v1(16.765,123.9)
F1D3: D78.D4 DD3.32 DD5.32 DD7.32 DD9.32 DD18.R14 | length 154.3
  L1:Top w0.1: DD3.32@11.559,114.9 18.044,114.9 v1(18.244,114.7) ; DD5.32@11.559,128.5 18.044,128.5 v1(18.244,128.3) ; DD18.R14@32.495,51.639 v1(32.495,52.099) ; v1@32.515,155.521 D78.D4@32.982,155.988
  L3:Sig w0.1: v1(18.244,128.3) 18.244,130.564 cw(c18.656,130.564) 18.365,130.855 18.907,131.397 ccw(c18.444,131.86) 19.099,131.86 19.099,144.593 cw(c19.385,144.593) 19.182,144.795 25.222,150.835 25.54,151.153 cw(c25.682,151.012) 25.823,151.153 25.946,151.031 ccw(c26.087,151.172) 26.229,151.031 ccw(c26.087,151.172) 26.229,151.313 25.848,151.694 cw(c25.989,151.835) 25.848,151.977 cw(c25.989,151.835) 26.131,151.977 26.511,151.596 ccw(c26.653,151.738) 26.794,151.596 ccw(c26.653,151.738) 26.794,151.879 26.414,152.26 cw(c26.555,152.401) 26.414,152.542 cw(c26.555,152.401) 26.697,152.542 27.077,152.162 ccw(c27.218,152.303) 27.36,152.162 ccw(c27.218,152.303) 27.36,152.445 26.979,152.825 cw(c27.121,152.967) 26.979,153.108 cw(c27.121,152.967) 27.262,153.108 27.643,152.728 ccw(c27.784,152.869) 27.926,152.728 ccw(c27.784,152.869) 27.926,153.01 27.545,153.391 cw(c27.687,153.532) 27.545,153.674 cw(c27.687,153.532) 27.828,153.674 28.208,153.293 ccw(c28.35,153.435) 28.491,153.293 ccw(c28.35,153.435) 28.491,153.576 28.111,153.957 cw(c28.252,154.098) 28.111,154.239 cw(c28.252,154.098) 28.394,154.239 28.774,153.859 ccw(c28.916,154) 29.057,153.859 ccw(c28.916,154) 29.057,154.142 28.934,154.264 cw(c29.076,154.406) 28.934,154.547 29.223,154.835 cw(c29.35,154.707) 29.35,154.888 31.463,154.888 ccw(c31.463,155.806) 32.112,155.157 v1@32.452,155.497 ; v1@18.265,128.3 18.265,114.7 18.265,108.217 18.859,107.622 18.859,65.275 32.036,52.099 v1@32.465,52.099 ; v1@32.452,155.497 cw(c32.485,155.464) v1(32.485,155.511)
  L8:Bot w0.1: DD7.32@11.559,110.4 12.369,110.4 13.169,111.2 17.965,111.2 v1(18.265,110.9) ; DD9.32@11.559,124 12.369,124 13.169,124.8 17.965,124.8 v1(18.265,124.5)
F1D4: D78.D8 DD3.41 DD5.41 DD7.41 DD9.41 DD18.L13 | length 145.4
  L1:Top w0.1: DD3.41@11.559,110.4 15.875,110.4 v1(16.265,110.79) ; DD5.41@11.559,124 15.875,124 v1(16.265,124.39) ; DD18.L13@31.121,49.338 v1(31.122,49.798) ; v1(36.621,156.511) D78.D8@37.088,156.044
  L3:Sig w0.1: v1(16.265,128.1) v1(16.265,124.39) v1(16.265,114.5) 16.265,108.225 17.494,106.996 17.494,62.964 28.433,52.024 30.661,49.797 31.12,49.797 v1(31.122,49.798) ; v1@36.61,156.536 cw(c36.585,156.511) v1(36.621,156.511)
  L6:Sig w0.1: v1(16.265,128.1) 16.265,129.472 18.092,131.299 18.092,143.499 30.732,156.138 36.248,156.138 v1(36.621,156.511)
  L8:Bot w0.1: DD7.41@11.559,114.9 15.865,114.9 v1(16.265,114.5) ; DD9.41@11.559,128.5 15.865,128.5 v1(16.265,128.1)
F1D5: D78.E9 DD3.42 DD5.42 DD7.42 DD9.42 DD18.P14 | length 151.6
  L1:Top w0.1: DD3.42@11.559,109.9 17.465,109.9 v1(17.765,110.2) ; DD5.42@11.559,123.5 17.465,123.5 v1(17.765,123.8) ; DD18.P14@32.04,51.176 v1(32.04,51.635) ; v1(37.621,155.511) D78.E9@38.088,155.044
  L3:Sig w0.1: v1(17.765,129.1) v1(17.765,123.8) v1(17.765,115.5) 17.765,108.212 18.549,107.427 18.549,64.666 31.58,51.635 v1(32.04,51.635)
  L6:Sig w0.1: v1(17.765,129.1) 18.855,130.191 18.855,142.478 27.045,150.668 27.363,150.986 cw(c27.505,150.845) 27.646,150.986 27.663,150.969 ccw(c27.805,151.111) 27.946,150.969 ccw(c27.805,151.111) 27.946,151.252 27.805,151.393 cw(c27.946,151.535) 27.805,151.676 cw(c27.946,151.535) 28.088,151.676 28.229,151.535 ccw(c28.37,151.676) 28.512,151.535 ccw(c28.37,151.676) 28.512,151.818 28.371,151.959 cw(c28.512,152.1) 28.371,152.242 cw(c28.512,152.1) 28.654,152.242 28.795,152.101 ccw(c28.936,152.242) 29.078,152.101 ccw(c28.936,152.242) 29.078,152.383 28.936,152.525 cw(c29.078,152.666) 28.936,152.807 cw(c29.078,152.666) 29.219,152.807 29.36,152.666 ccw(c29.502,152.808) 29.643,152.666 ccw(c29.502,152.808) 29.643,152.949 29.626,152.966 cw(c29.768,153.108) 29.626,153.249 30.013,153.636 31.535,155.158 37.268,155.158 v1(37.621,155.511)
  L8:Bot w0.1: DD7.42@11.559,115.4 16.116,115.4 16.491,115.025 17.29,115.025 v1(17.765,115.5) ; DD9.42@11.559,129 16.009,129 16.384,128.625 17.29,128.625 v1(17.765,129.1)
F1D6: D78.F9 DD3.43 DD5.43 DD7.43 DD9.43 DD18.N14 | length 149
  L1:Top w0.1: DD3.43@11.559,109.4 v1(17.265,109.4) ; DD5.43@11.559,123 v1(17.265,123) ; DD18.N14@31.58,50.716 v1(31.58,51.176) ; v1(37.621,154.511) D78.F9@38.088,154.044
  L3:Sig w0.1: v1(17.265,129.9) 17.265,108.215 18.195,107.285 18.195,64.101 31.12,51.176 v1(31.58,51.176)
  L6:Sig w0.1: v1(17.265,129.9) 18.494,131.13 18.494,142.891 31.484,155.881 37.797,155.881 38.045,155.633 38.045,154.936 v1(37.621,154.511)
  L8:Bot w0.1: DD7.43@11.559,115.9 16.865,115.9 v1(17.265,116.3) ; DD9.43@11.559,129.5 16.865,129.5 v1(17.265,129.9)
F1D7: D78.F10 DD3.44 DD5.44 DD7.44 DD9.44 DD18.U15 | length 157.6
  L1:Top w0.1: DD3.44@11.559,108.9 18.765,108.9 v1(19.265,108.4) ; DD5.44@11.559,122.5 18.765,122.5 v1(19.265,122) ; DD18.U15@32.964,53.024 v1@33.271,53.331 ; v1(38.621,154.511) D78.F10@39.088,154.044
  L3:Sig w0.1: v1(19.265,130.4) v1(19.265,122) v1(19.265,116.8) v1(19.265,108.4) 19.459,108.205 19.459,67.098 v1(33.241,53.317) ; v1@38.52,154.469 cw(c38.621,154.369) v1(38.621,154.511) v1@38.538,154.429
  L6:Sig w0.1: v1(19.265,130.4) 19.265,141.675 25.238,147.648 25.556,147.967 cw(c25.698,147.825) 25.839,147.967 26.015,147.791 ccw(c26.156,147.932) 26.298,147.791 ; 26.298,147.791 ccw(c26.156,147.932) 26.298,148.073 ; 26.298,148.073 25.948,148.424 cw(c26.089,148.565) 25.948,148.706 cw(c26.089,148.565) 26.231,148.706 26.581,148.356 ccw(c26.722,148.498) 26.864,148.356 ccw(c26.722,148.498) 26.864,148.639 26.513,148.989 cw(c26.655,149.131) 26.513,149.272 cw(c26.655,149.131) 26.796,149.272 27.146,148.922 ccw(c27.288,149.063) 27.429,148.922 ccw(c27.288,149.063) 27.429,149.205 27.079,149.555 cw(c27.221,149.696) 27.079,149.838 cw(c27.221,149.696) 27.362,149.838 27.712,149.488 ccw(c27.854,149.629) 27.995,149.488 ccw(c27.854,149.629) 27.995,149.771 27.819,149.946 cw(c27.96,150.088) 27.819,150.229 28.013,150.423 32.489,154.899 36.259,154.899 37.034,154.125 38.234,154.125 v1(38.621,154.511)
  L8:Bot w0.1: DD7.44@11.559,116.4 12.596,116.4 12.996,116.8 v1(19.265,116.8) ; DD9.44@11.559,130 12.596,130 12.996,130.4 v1(19.265,130.4)
F1DQS_N: D78.F4 DD18.U14 | length 126.7
  L1:Top w0.1: D78.F4@33.088,153.993 33.198,154.103 ccw(c32.799,154.502) v1(33.363,154.502) ; DD18.U14@33.419,52.554 cw(c33.494,52.554) 33.441,52.608 33.936,53.103 ccw(c32.637,54.403) 34.453,54.123 ccw(c32.637,54.403) 34.475,54.403 34.475,55.281 ccw(c33.691,55.281) 34.245,55.835 33.993,56.087 cw(c34.026,56.12) 33.98,56.12 ccw(c33.933,56.12) 33.966,56.153 33.951,56.168 cw(c34.066,56.283) v1(33.903,56.283)
  L3:Sig w0.1: 20.526,133.596 20.526,70.183 ccw(c22.162,70.183) 21.005,69.026 32.189,57.842 32.224,57.807 ccw(c32.366,57.948) 32.507,57.807 32.552,57.851 cw(c32.693,57.71) 32.835,57.851 cw(c32.693,57.71) 32.835,57.569 32.79,57.524 ccw(c32.931,57.382) 32.79,57.241 ccw(c32.931,57.382) 33.073,57.241 33.118,57.286 cw(c33.259,57.144) 33.401,57.286 cw(c33.259,57.144) 33.401,57.003 33.356,56.958 ccw(c33.497,56.817) 33.356,56.675 33.637,56.393 ccw(c33.788,56.544) 33.788,56.331 cw(c33.788,56.168) v1(33.903,56.283) ; 20.526,133.599 20.526,141.244 cw(c23.066,141.244) 21.27,143.04 21.278,143.048 21.394,143.164 ; 21.395,143.165 21.839,143.609 cw(c21.981,143.468) 22.123,143.609 ; 22.123,143.609 22.241,143.492 ccw(c22.545,143.795) 22.883,144.062 22.883,144.066 22.683,144.266 cw(c22.824,144.408) 22.966,144.549 23.132,144.383 ccw(c23.436,144.686) 23.774,144.952 23.774,144.957 23.574,145.157 cw(c23.715,145.299) 23.857,145.44 ; 23.857,145.439 24.022,145.274 ccw(c24.327,145.577) 24.665,145.843 24.665,145.848 24.465,146.048 cw(c24.606,146.19) 24.748,146.331 24.913,146.165 ccw(c25.218,146.468) 25.556,146.734 25.556,146.739 25.356,146.939 cw(c25.497,147.081) 25.639,147.221 ; 25.639,147.221 25.804,147.056 ccw(c26.109,147.359) 26.447,147.625 26.447,147.63 26.247,147.83 cw(c26.388,147.971) 26.53,148.112 26.695,147.947 ccw(c27,148.25) 27.338,148.516 27.338,148.52 27.138,148.72 cw(c27.279,148.862) 27.421,149.003 ; 27.421,149.003 27.586,148.838 ccw(c27.891,149.141) 28.229,149.407 28.229,149.411 28.029,149.611 cw(c28.17,149.753) 28.312,149.894 28.477,149.729 ccw(c28.782,150.032) 29.12,150.298 29.12,150.302 28.92,150.502 cw(c29.061,150.644) 29.203,150.785 ; 29.203,150.785 29.368,150.62 ccw(c29.673,150.923) 30.011,151.189 30.011,151.193 29.859,151.345 ; 29.859,151.345 cw(c30,151.487) 29.859,151.629 ; 29.859,151.629 30.441,152.211 ; 30.442,152.212 30.558,152.328 33.095,154.865 cw(c33.271,154.689) 33.271,154.938 33.32,154.938 cw(c33.32,154.78) 33.431,154.892 cw(c33.329,154.789) 33.473,154.789 33.473,154.731 cw(c33.348,154.731) v1@33.437,154.643 ; v1(33.363,154.502) cw(c33.527,154.502) 33.411,154.617 v1@33.437,154.643